# Altium PCB 0.PCB1.PcbDoc (part 10 of 12)
Units mm, origin at the board's own origin, x right, y up, seen from the top; angles counter-clockwise.
Board outline 77 x 72 mm, 6 copper layers (Top Layer, Layer 1, Layer 3, Layer 4, Layer 2, Bottom Layer), stack 1.538 mm thick; 570 components, 490 nets, 3331 pads, 1909 vias.
Unrouted connection lines stored in the file: 2.
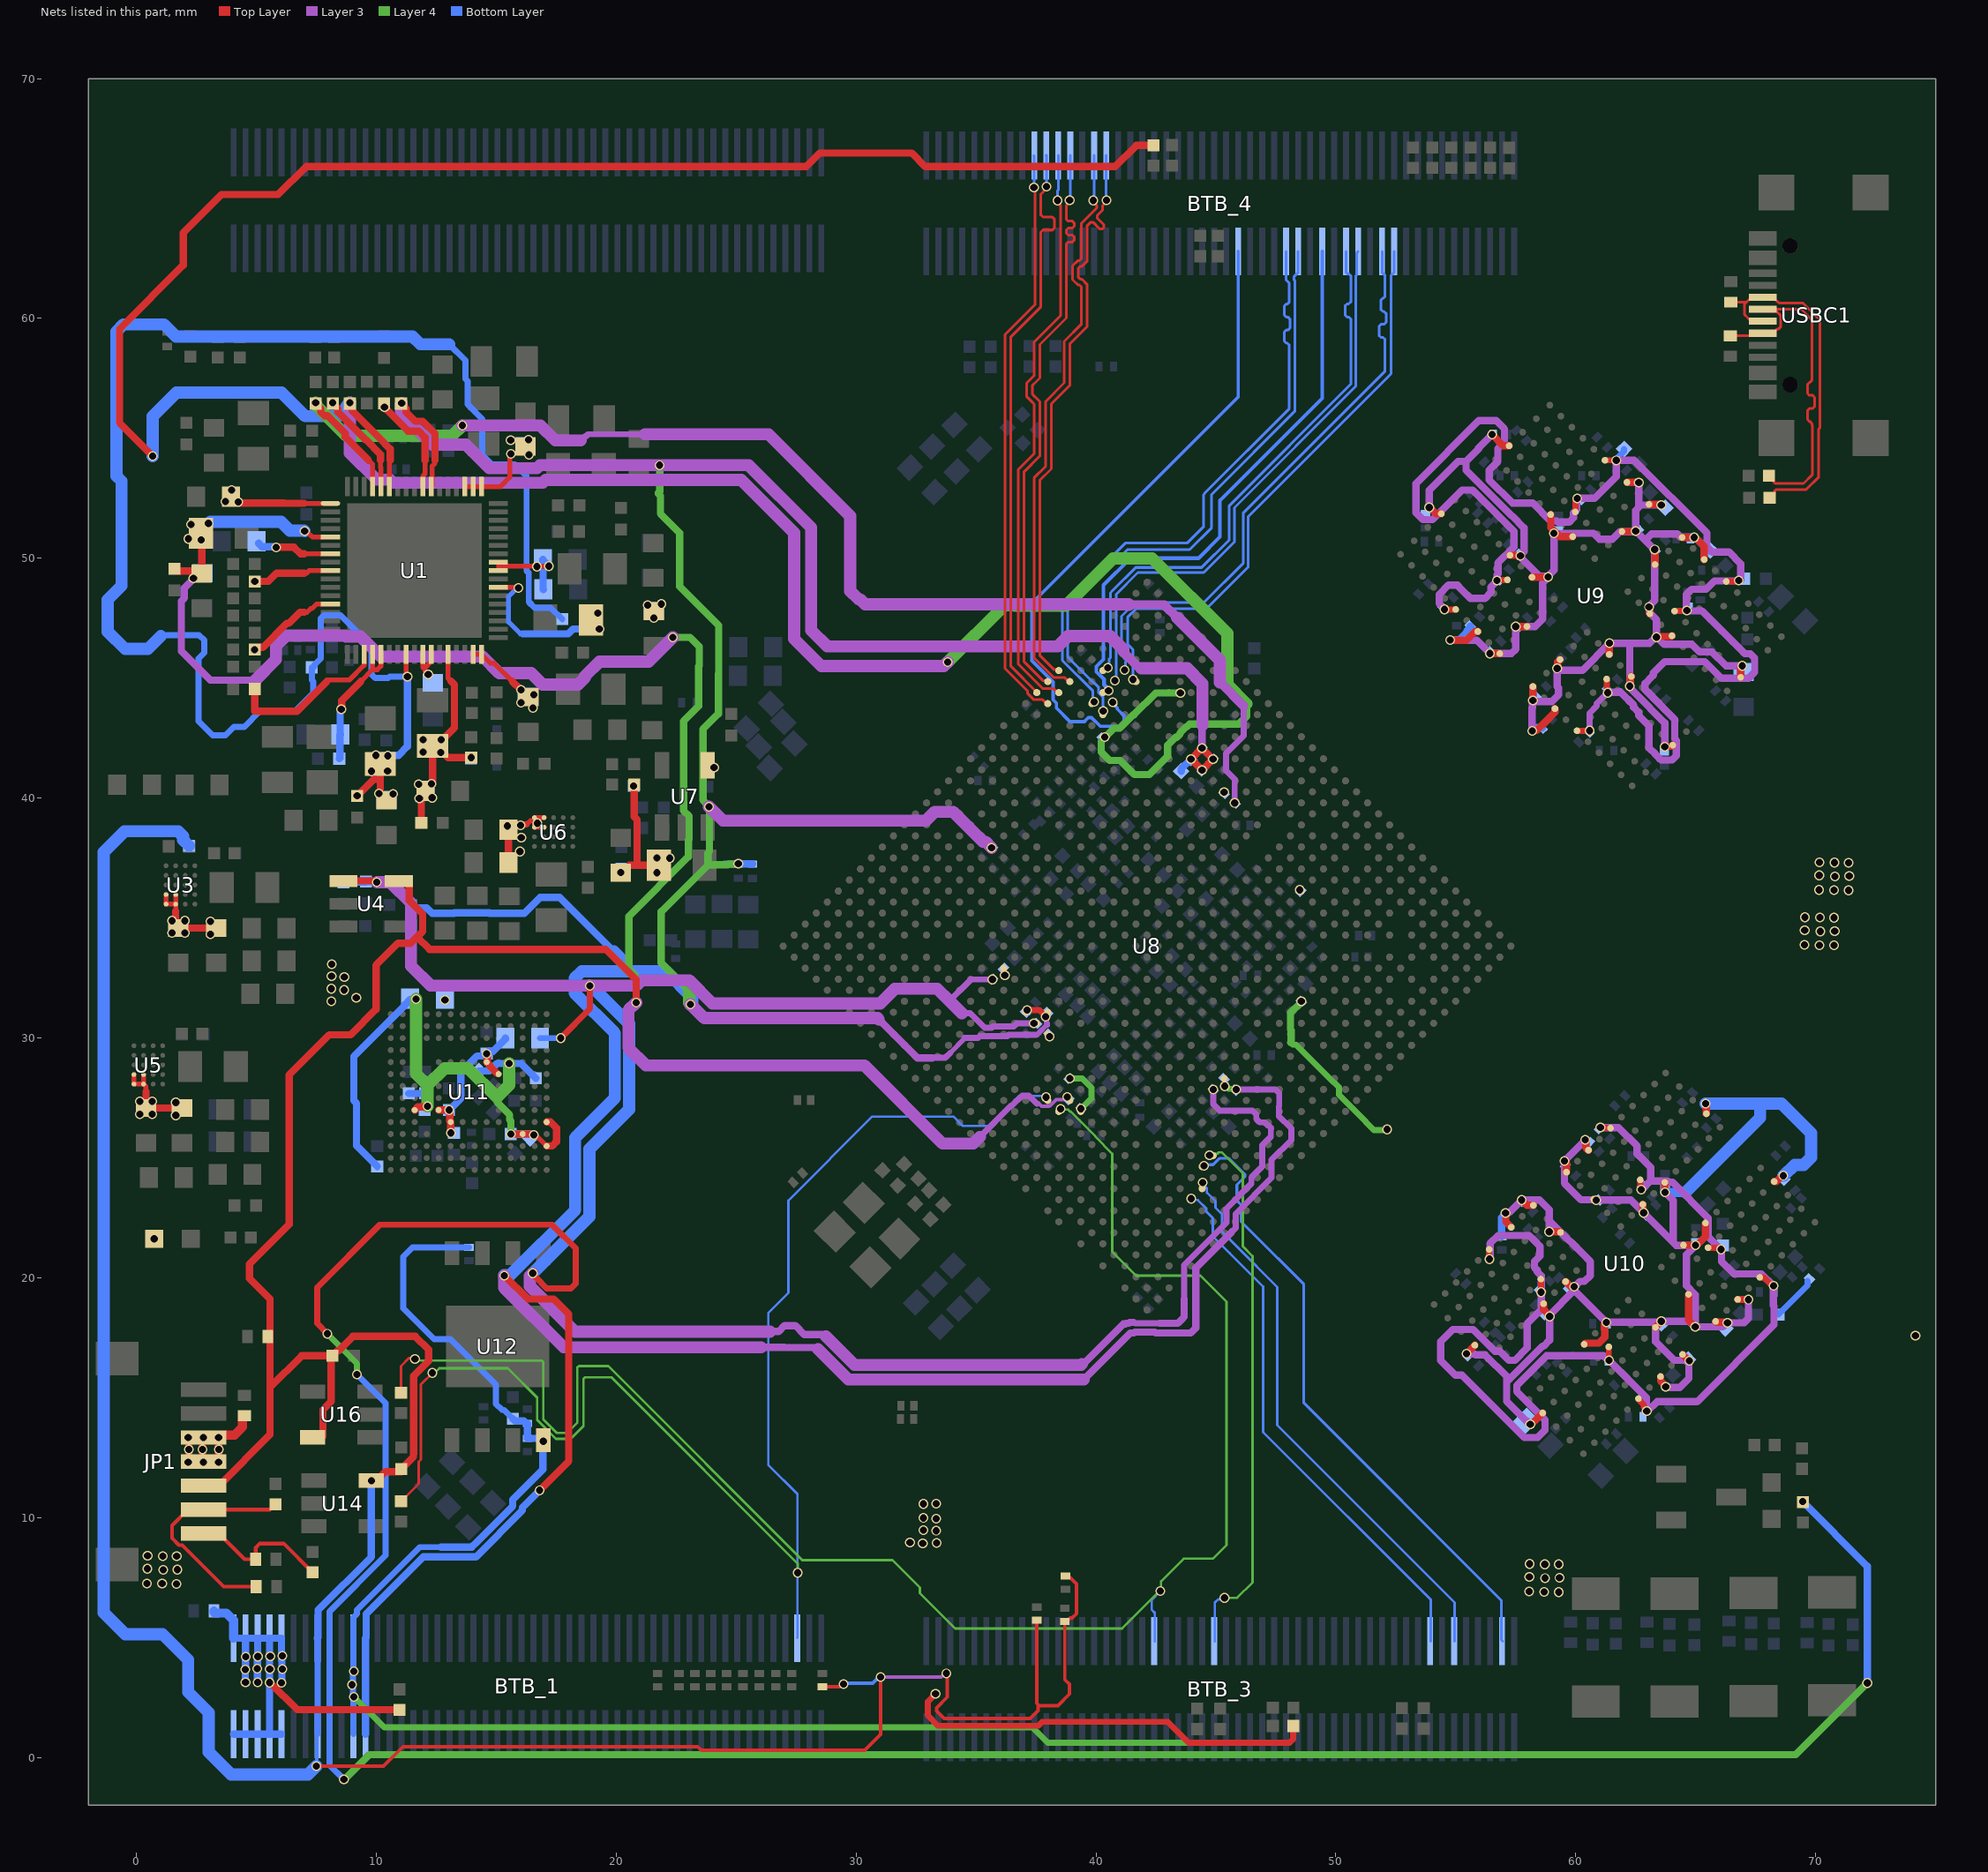
[diagram p14: the nets of this part, all layers, seen from the top]

## Via types
v1: diameter 0.41, hole 0.3, Top Layer to Bottom Layer, tented both sides, 1901 vias
v2: diameter 0.41, hole 0.3, Top Layer to Bottom Layer, 8 vias

## Nets (pads, with @x,y where several pads share a name; then routed paths per layer and width w, separated by ;. In a path a pad name is that pad's centre, name@x,y a point inside that pad or via, vN(x,y) a via of type N, cw(c..) or ccw(c..) an arc to the next point about the centre after c; other vN are vias at no path point) (continued)
TYPEC1_SSRX2N: BTB_4.13 U8.AP10 | length 24.5
  Top Layer w0.112: U8.AP10@37.994,44.856 37.961,44.889 37.801,44.889 37.142,45.548 37.01,45.68 37.01,53.607 37.665,54.262 37.665,55.987 37.665,56.528 37.444,56.75 37.439,56.75 37.357,56.832 37.357,57.212 37.439,57.294 37.444,57.294 37.665,57.516 37.665,58.524 37.665,58.915 38.769,60.019 38.769,62.187 38.769,63.113 38.842,63.186 39.02,63.186 39.093,63.258 39.093,63.403 39.02,63.476 38.842,63.476 38.769,63.548 38.769,63.694 38.842,63.766 39.02,63.766 39.093,63.839 39.093,63.984 39.02,64.056 38.842,64.056 38.769,64.129 38.769,64.706 38.905,64.842 38.905,64.854 v1(38.905,64.92)
  Bottom Layer w0.112: v1(38.905,64.92) 38.931,64.946 BTB_4.13@38.931,66.793
TYPEC1_SSRX2P: BTB_4.12 U8.AN10 | length 24.4
  Top Layer w0.112: v1(38.394,64.916) 38.394,64.838 38.53,64.702 38.53,63.376 38.53,60.118 37.426,59.014 37.426,58.524 37.426,57.615 37.345,57.533 37.34,57.533 37.118,57.312 37.118,56.732 37.34,56.511 37.345,56.511 37.426,56.429 37.426,55.987 37.426,54.361 36.77,53.706 36.77,45.581 37.496,44.855 37.793,44.559 38.241,44.559 38.403,44.397 U8.AN10@38.454,44.397
  Bottom Layer w0.112: v1(38.394,64.916) 38.394,65.312 38.431,65.349 BTB_4.12@38.431,66.793
TYPEC1_SSTX1N: BTB_4.15 U8.AN9 | length 24.3
  Top Layer w0.112: U8.AN9@38.913,44.856 38.862,44.856 38.7,45.018 38.253,45.018 37.421,45.85 37.421,53.345 37.903,53.827 37.903,56.534 38.678,57.31 38.678,59.044 39.398,59.763 39.398,61.184 39.398,61.31 39.316,61.392 39.25,61.392 39.029,61.613 39.029,62.193 39.25,62.414 39.316,62.414 39.398,62.496 39.398,63.62 39.398,63.969 40.038,64.609 40.038,64.702 39.895,64.844 v1(39.895,64.916)
  Bottom Layer w0.112: v1@39.931,64.952 BTB_4.15@39.931,66.793
TYPEC1_SSTX1P: BTB_4.16 U8.AP9 | length 24.3
  Top Layer w0.112: U8.AP9@38.454,45.316 38.421,45.349 38.261,45.349 37.66,45.949 37.66,53.246 38.142,53.728 38.142,56.435 38.917,57.21 38.917,58.945 39.637,59.664 39.637,61.184 39.637,61.409 39.415,61.631 39.349,61.631 39.268,61.713 39.268,62.093 39.349,62.175 39.415,62.175 39.637,62.397 39.637,63.62 39.637,63.87 ; 39.641,63.869 39.785,64.013 39.878,64.013 40.166,63.725 40.259,63.725 40.339,63.804 40.339,63.897 40.048,64.188 40.048,64.281 40.277,64.51 40.277,64.691 40.447,64.861 v1(40.447,64.92)
  Bottom Layer w0.112: v1@40.431,64.936 BTB_4.16@40.431,66.793
TYPEC1_SSTX2N: BTB_4.10 U8.AN11 | length 24.4
  Top Layer w0.112: v1(37.415,65.454) 37.469,65.4 37.469,60.587 36.219,59.336 36.219,50.58 36.219,48.646 36.219,45.39 37.154,44.455 37.154,44.356 37.411,44.099 37.781,44.099 37.943,43.937 U8.AN11@37.994,43.937
  Bottom Layer w0.112: BTB_4.10@37.406,66.79 37.423,66.773 37.423,65.461 v1(37.415,65.454)
TYPEC1_SSTX2P: BTB_4.11 U8.AP11 | length 24.4
  Top Layer w0.112: U8.AP11@37.534,44.397 37.534,44.413 36.458,45.489 36.458,59.237 37.708,60.488 37.708,63.003 37.708,63.603 37.79,63.684 38.183,63.684 38.264,63.766 38.264,64.147 38.183,64.228 37.79,64.228 37.708,64.31 37.708,64.631 37.708,65.186 37.942,65.42 v1(37.942,65.491)
  Bottom Layer w0.112: v1@37.931,65.502 37.936,65.508 37.936,66.788 BTB_4.11@37.931,66.793
TYPEC1_USB20_OTG_DM: BTB_4.70 U8.AL9 | length 25.3
  Bottom Layer w0.112: v1(39.932,44.019) 39.875,44.076 39.875,44.463 38.6,45.738 38.6,46.543 38.594,46.548 38.594,47.996 41.227,50.628 43.796,50.628 44.492,51.325 44.492,52.644 44.522,52.674 44.522,52.7 48.061,56.239 48.061,58.832 48.061,58.888 47.98,58.969 47.938,58.969 47.856,59.051 47.856,59.431 47.938,59.513 48.006,59.513 48.087,59.594 48.087,59.975 48.006,60.056 47.938,60.056 47.856,60.138 47.856,60.518 47.938,60.6 47.98,60.6 48.061,60.681 48.061,61.143 48.061,61.465 47.931,61.596 BTB_4.70@47.931,62.793
TYPEC1_USB20_OTG_DP: BTB_4.69 U8.AK9 | length 25.3
  Bottom Layer w0.112: v1(40.302,43.633) 40.302,44.195 40.17,44.327 40.17,44.336 40.116,44.39 40.116,44.615 39.95,44.781 39.923,44.781 38.823,45.88 38.823,46.777 38.823,47.872 41.311,50.359 43.907,50.359 44.823,51.274 44.823,52.662 48.301,56.14 48.301,58.832 48.301,61.565 48.262,61.603 48.262,61.749 48.431,61.918 BTB_4.69@48.431,62.793
TYPEC1_USB20_OTG_ID: BTB_4.74 U8.AK8 | length 27.4
  Bottom Layer w0.142: v1(40.693,43.997) 40.693,43.951 40.894,43.75 40.894,43.709 41.175,43.427 41.175,43.226 40.942,42.992 40.18,42.992 39.814,43.358 39.69,43.358 39.602,43.27 39.595,43.27 39.519,43.193 38.921,43.193 38.354,43.759 38.354,43.966 38.221,44.099 38.221,44.84 37.554,45.507 37.335,45.726 37.335,48.126 45.931,56.722 BTB_4.74@45.931,62.793
TYPEC1_USB20_VBUSDET: BTB_4.67 U8.AL8 | length 24.1
  Bottom Layer w0.156: v1(40.522,44.473) 40.522,44.541 40.341,44.722 40.341,44.95 40.022,45.269 40.022,45.489 40.312,45.779 40.312,48.265 40.312,48.879 41.43,49.998 44.274,49.998 45.172,50.896 45.172,52.407 49.431,56.666 BTB_4.67@49.431,62.793
typec_dn: R131.1 U13.2 USBC1.A7 USBC1.B7 | length 14.4
  Top Layer w0.112: U13.2@66.441,59.275 67.265,59.275 67.384,59.393 67.783,59.393 USBC1.B7@67.796,59.38 68.221,59.38 68.391,59.551 68.446,59.551 68.551,59.656 68.551,60.112 68.377,60.286 67.89,60.286 USBC1.A7@67.796,60.38 ; R131.1@68.059,53.439 68.254,53.245 68.254,53.182 68.319,53.116 69.5,53.116 69.874,53.491 69.874,55.535 69.844,55.565 69.844,55.621 69.763,55.703 69.747,55.703 69.666,55.784 69.666,56.165 69.747,56.246 69.88,56.246 69.961,56.328 69.961,56.708 69.88,56.79 69.747,56.79 69.666,56.871 69.666,57.252 69.747,57.333 69.763,57.333 69.844,57.415 69.844,58.122 69.844,59.942 69.406,60.38 USBC1.A7@68.347,60.38
typec_dp: R129.1 U15.2 USBC1.A6 USBC1.B6 | length 14.6
  Top Layer w0.112: U15.2@66.466,60.678 67.115,60.678 ; USBC1.A6@67.796,59.88 67.702,59.975 67.223,59.975 67.147,60.051 67.041,60.156 67.041,60.605 67.115,60.678 ; R129.1@68.085,52.525 68.279,52.719 68.279,52.793 68.344,52.858 69.607,52.858 70.132,53.384 70.132,55.386 70.174,55.429 70.174,59.942 69.476,60.64 68.484,60.64 68.436,60.688 68.414,60.688 68.221,60.88 USBC1.B6@67.796,60.88 67.724,60.809 67.245,60.809 67.115,60.678
UART2_RX: JP1.1 R122.1 U19.2 | length 6
  Top Layer w0.156: JP1.1@2.796,9.333 3.446,9.333 4.09,8.689 4.09,8.685 4.512,8.263 U19.2@4.972,8.263 4.972,8.738 5.15,8.917 6.141,8.917 R122.1@7.346,7.711
UART2_RX_M0_DEBUG: BTB_1.48 R123.2 U8.R29 | length 60.8
  Top Layer w0.102: R123.2@11.033,10.676 11.767,11.41 11.767,12.319 11.865,12.417 11.865,15.551 v1(12.342,16.028)
  Layer 4 w0.102: v1(12.342,16.028) 12.425,16.028 12.625,16.228 15.479,16.228 16.707,15 16.707,14.065 17.491,13.282 18.104,13.282 18.638,13.815 18.638,15.788 18.697,15.847 19.802,15.847 27.573,8.076 v1(27.573,7.7)
  Bottom Layer w0.102: BTB_1.48@27.544,4.988 27.56,5.004 v1@27.56,7.7 ; v1(27.573,7.7) 27.56,7.713 27.56,10.974 26.342,12.192 26.342,18.53 27.177,19.366 27.177,23.218 30.677,26.719 32.989,26.719 34.056,26.719 34.443,26.331 35.541,26.331 36.376,27.166 36.39,27.166 36.805,27.581 37.864,27.581 v1(37.921,27.525)
UART2_TX: JP1.2 R126.1 U18.2 | length 9.6
  Top Layer w0.156: U18.2@4.991,7.12 3.639,7.12 1.906,8.853 1.772,8.853 1.483,9.142 1.483,9.669 2.146,10.333 JP1.2@2.796,10.333 5.574,10.333 R126.1@5.797,10.556
UART2_TX_M0_DEBUG: BTB_3.20 R127.2 U8.P29 | length 72.3
  Top Layer w0.102: R127.2@11.033,15.204 11.033,16.319 11.373,16.66 11.377,16.657 11.564,16.657 v1(11.614,16.607)
  Layer 4 w0.102: v1(11.614,16.607) 11.673,16.548 16.902,16.548 16.961,16.489 16.961,14.099 17.532,13.528 17.944,13.528 18.384,13.968 18.384,16.256 18.443,16.316 19.671,16.316 27.759,8.227 31.516,8.227 32.659,7.084 32.659,6.84 34.128,5.37 41.091,5.37 42.653,6.932 v1(42.687,6.932) ; v1(38.53,27.033) 38.556,27.008 38.837,27.008 38.917,26.927 38.952,26.927 39.978,25.901 39.978,25.876 40.685,25.169 40.685,21.08 41.681,20.084 44.36,20.084 44.501,19.943 45.445,19 45.445,8.852 44.876,8.283 43.662,8.283 42.717,7.338 v1@42.717,6.932
  Bottom Layer w0.102: BTB_3.20@42.455,4.843 42.455,6.026 42.329,6.151 42.329,6.575 v1(42.687,6.932)
UART4_RX_M2: BTB_3.45 U8.D26 | length 23.5
  Bottom Layer w0.102: v1(44.446,23.964) 44.446,23.911 44.629,23.728 44.629,23.544 44.984,23.189 44.984,22.923 45.26,22.647 45.26,21.916 45.867,21.309 47.563,19.613 47.563,13.848 54.955,6.457 BTB_3.45@54.955,4.843
UART4_TX_M2: BTB_3.43 U8.D27 | length 22.7
  Bottom Layer w0.102: v1(43.977,23.295) 44.036,23.236 44.252,23.236 44.597,22.891 44.597,22.763 44.874,22.487 44.874,21.727 45.58,21.021 46.969,19.632 46.969,13.561 53.955,6.575 BTB_3.43@53.955,4.843
UART7_RX_M2: BTB_3.25 U8.E24 | length 22.6
  Layer 4 w0.102: v1(44.737,25.112) 44.796,25.171 45.066,25.171 45.124,25.229 45.248,25.229 46.121,24.356 46.121,21.562 46.121,21.308 46.527,20.902 46.527,7.288 45.892,6.653 v1(45.359,6.653)
  Bottom Layer w0.102: BTB_3.25@44.955,4.843 44.955,6.451 45.09,6.586 45.292,6.586 v1(45.359,6.653)
UART7_TX_M2: BTB_3.49 U8.E25 | length 26.3
  Bottom Layer w0.114: v1(44.506,24.667) 44.549,24.71 44.882,24.71 45.146,24.974 45.554,24.974 46.216,24.312 46.216,24.217 45.874,23.876 45.874,23.216 46.044,23.046 46.044,22.35 46.476,21.918 48.669,19.725 48.669,14.78 56.903,6.546 56.903,4.895 BTB_3.49@56.955,4.843
USB20_HOST0_DM: BTB_4.62 U8.AL6 | length 24.4
  Bottom Layer w0.112: v1(41.195,45.344) 41.229,45.378 41.229,45.662 41.246,45.68 41.246,45.772 41.063,45.955 41.063,47.582 41.624,48.142 42.616,48.142 42.623,48.15 44.502,48.15 46.136,49.784 46.136,51.88 52.054,57.798 52.054,59.069 52.054,59.124 51.973,59.206 51.882,59.206 51.8,59.287 51.8,59.668 51.882,59.75 52.012,59.75 52.094,59.831 52.094,60.212 52.012,60.293 51.956,60.293 51.874,60.375 51.874,60.755 51.956,60.837 51.973,60.837 52.054,60.918 52.054,61.471 52.054,61.795 51.931,61.918 BTB_4.62@51.931,62.793
USB20_HOST0_DP: BTB_4.61 U8.AK6 | length 24.3
  Bottom Layer w0.112: v1(41.539,44.944) 41.547,44.953 41.547,46.19 41.317,46.421 41.317,47.533 41.681,47.897 44.607,47.897 46.349,49.64 46.349,51.735 52.307,57.693 52.307,61.795 52.431,61.918 BTB_4.61@52.431,62.793
USB20_HOST1_DM: BTB_4.65 U8.AM7 | length 23.6
  Bottom Layer w0.112: v1(40.49,45.428) 40.547,45.485 40.547,45.789 40.606,45.848 40.606,48.56 40.692,48.646 41.66,49.614 42.605,49.614 44.406,49.614 45.559,50.767 45.559,52.195 50.622,57.258 50.622,59.921 50.622,59.977 50.541,60.059 50.467,60.059 50.386,60.14 50.386,60.521 50.467,60.602 50.541,60.602 50.622,60.684 50.622,61.07 50.622,61.784 50.557,61.849 50.5,61.849 50.431,61.918 BTB_4.65@50.431,62.793
USB20_HOST1_DP: BTB_4.64 U8.AL7 | length 23.7
  Bottom Layer w0.112: v1(40.794,44.895) 40.843,44.943 40.843,48.495 41.749,49.401 42.819,49.401 44.494,49.401 45.773,50.679 45.773,52.106 50.836,57.17 50.836,61.784 50.862,61.809 50.862,62.724 BTB_4.64@50.931,62.793
VCC1V8_PMU_DDR_S3: BTB_1.11 BTB_1.90 C65.2 C66.2 C67.2 C179.2 C183.2 C215.2 C297.2 C298.2 C299.2 C300.2 C301.2 C302.2 C303.2 C304.2 C305.2 C341.2 C342.2 C343.2 C344.2 C345.2 C346.2 C347.2 C348.2 C349.2 C396.2 C397.2 L9.2 R14.1 R16.1 R103.1 R109.1 R110.1 R147.2 U1.25 U8.N28 U8.R27 U8.V26 U9.F1 U9.F12 U9.G4 U9.G9 U9.T4 U9.T9 U9.U1 U9.U12 U10.F1 U10.F12 U10.G4 U10.G9 U10.T4 U10.T9 U10.U1 U10.U12 U12.8 | length 279.7
  Top Layer w0.203: U1.25@11.24,45.988 11.24,45.189 11.297,45.132 v1(11.297,45.066)
  Top Layer w0.254: v1(33.314,2.644) 32.986,2.317 32.986,1.743 33.413,1.316 37.589,1.316 37.754,1.481 42.994,1.481 43.868,0.607 48.069,0.607 48.224,0.762 R147.2@48.224,1.308 ; v1(54.527,47.866) 54.529,47.864 54.997,47.864 U9.F1@54.999,47.862 ; U10.U1@56.397,21.181 56.397,20.785 56.404,20.778 v1@56.411,20.778 ; v1(56.712,49.071) 56.736,49.095 57.151,49.095 U9.G4@57.156,49.1 ; U10.T4@58.549,19.949 U10.T4@58.553,19.944 58.558,19.94 58.558,19.489 58.617,19.429 v1@58.643,19.429 ; U9.G9@59.984,51.928 59.989,51.933 59.989,52.372 60.062,52.445 v1(60.062,52.498) ; U9.U1@60.055,42.806 v1@60.576,42.807 ; v1(61.03,26.261) 61.05,26.242 61.448,26.242 U10.F1@61.453,26.237 ; U9.F12@61.222,54.085 61.223,54.083 61.689,54.083 v1(61.691,54.081) ; U9.T4@61.292,44.963 61.297,44.958 61.297,44.466 61.33,44.433 v1(61.33,44.391) ; U10.T9@61.382,17.115 61.382,16.563 v1(61.386,16.559) ; U10.U12@62.619,14.959 62.624,14.954 62.624,14.926 62.847,14.703 62.847,14.604 ; U10.G4@62.69,24.08 62.695,24.075 62.695,23.708 v1(62.732,23.671) ; U9.T9@64.121,47.791 64.126,47.796 64.608,47.796 v1(64.637,47.826) ; U10.G9@65.518,21.252 65.523,21.248 65.94,21.248 66.007,21.181 v1(66.06,21.181) ; U9.U12@66.277,49.029 66.282,49.034 66.759,49.034 v1(66.796,49.071) ; U10.F12@67.675,20.015 67.68,20.01 67.839,20.01 68.191,19.657 v1(68.244,19.657)
  Top Layer w0.305: v1(9.203,40.091) 9.887,40.775 10.168,40.775 ; L9.2@10.168,41.427 10.168,40.775 ; C65.2@10.422,39.901 10.391,39.901 10.168,40.124 10.168,40.775 ; v1(16.961,13.18) U12.8@16.961,13.229
  Layer 3 w0.254: v1(60.577,42.808) 60.577,43.542 60.874,43.839 60.874,43.934 v1(61.33,44.391)
  Layer 3 w0.305: v1(54.527,47.866) 54.527,47.894 54.308,48.113 54.308,48.491 54.7,48.883 55.049,48.883 55.608,48.324 56.217,48.324 56.465,48.572 56.465,48.795 56.707,49.037 v1@56.707,49.071 ; v1(56.411,20.778) 56.432,20.798 56.432,21.424 56.768,21.761 58.059,21.761 58.508,21.311 58.508,20.902 58.285,20.679 58.285,20.426 58.397,20.315 58.397,20.25 58.562,20.085 v1(58.562,19.398) 58.562,18.662 57.977,18.078 57.977,17.069 57.465,16.557 57.212,16.557 56.834,16.935 56.634,16.935 55.724,17.844 54.881,17.844 54.373,17.336 54.373,16.551 54.988,15.936 55.26,15.936 57.858,13.338 58.419,13.338 58.724,13.643 58.724,14.074 57.544,15.255 57.544,15.508 58.78,16.744 61.172,16.744 61.358,16.559 v1(61.386,16.559) 62.944,15 62.944,14.454 v1(62.964,14.434) 62.993,14.434 63.393,14.834 65.064,14.834 68.269,18.039 68.269,18.821 68.244,18.847 v1(68.244,19.657) 67.741,20.16 66.597,20.16 66.08,20.678 66.08,21.161 65.531,21.71 65.531,22.484 64.038,23.978 63.883,23.978 63.827,24.034 63.124,24.034 ; v1(56.712,49.071) 56.733,49.091 56.733,49.315 56.763,49.346 56.763,49.8 57.431,50.468 57.431,51.11 55.7,52.842 55.264,52.842 54.033,51.611 53.626,51.611 53.344,51.893 53.344,53.122 55.963,55.741 56.679,55.741 57.028,55.392 57.028,54.85 56.753,54.575 56.753,54.029 56.396,53.671 56.396,53.267 57.361,52.301 58.209,52.301 58.953,51.557 59.204,51.557 59.257,51.504 59.727,51.504 59.905,51.682 59.905,51.882 60.042,52.019 60.042,52.461 v1@60.079,52.498 ; v1(60.062,52.498) v1@60.079,52.498 ; v1(61.03,26.261) 61.785,26.261 62.559,25.487 62.559,25.167 63.124,24.602 63.124,24.034 ; v1(61.33,44.391) 61.35,44.411 61.856,44.411 61.868,44.423 62.415,43.876 62.415,43.787 62.62,43.582 62.62,43.447 63.05,43.018 63.05,42.108 63.334,41.824 63.334,41.809 63.558,41.585 64.017,41.585 64.195,41.764 64.195,42.395 64.127,42.464 64.127,43.285 62.892,44.52 62.892,44.772 63.179,45.06 63.243,45.123 63.243,45.22 63.708,45.685 65.381,45.685 66.067,44.999 67.215,44.999 67.459,45.243 67.459,45.844 67.281,46.023 67.048,46.023 65.264,47.806 64.657,47.806 v1(64.637,47.826) ; v1@61.686,54.052 61.691,54.046 61.691,53.403 60.786,52.498 v1@60.079,52.498 ; v1(61.691,54.081) 61.693,54.083 62.442,54.083 65.473,51.052 65.473,50.47 65.681,50.262 66.387,50.262 66.875,49.774 v1@66.875,49.088 ; v1(62.732,23.671) 62.761,23.671 63.124,24.034 ; v1@64.614,47.907 64.614,48.481 64.835,48.702 65.435,48.702 65.786,49.054 66.779,49.054 v1(66.796,49.071)
  Layer 4 w0.254: v1(9.058,2.521) 10.33,1.25 37.355,1.25 37.995,0.61 45.745,0.61 ; v1(38.913,28.31) 39.429,28.31 39.811,27.928 39.811,27.484 v1(39.374,27.046)
  Bottom Layer w0.254: 1.017,46.749 1.066,46.798 2.615,46.798 2.829,46.584 2.829,46.061 2.593,45.824 2.593,43.198 3.172,42.619 3.713,42.619 4.063,42.97 4.498,42.97 5.156,43.627 6.614,43.627 7.374,44.387 7.374,44.859 7.311,44.921 R14.1@7.311,45.45 ; R14.1@7.406,45.466 7.406,45.545 7.682,45.821 7.682,46.264 7.682,47.489 7.817,47.624 8.506,47.624 9.806,46.323 9.806,45.15 9.955,45.001 10.498,45.001 10.563,45.066 v1(11.297,45.066) ; BTB_1.90@9.051,0.97 9.051,2.521 9.029,2.544 9.029,2.951 8.993,2.986 v1(8.993,3.028) 9.023,3.058 9.023,3.508 9.051,3.536 BTB_1.11@9.051,4.97 9.051,5.841 9.197,5.987 9.197,6.139 11.826,8.767 12.693,8.767 ; v1(12.863,31.581) R103.1@12.863,31.641 ; 13.042,58.921 13.711,58.252 13.711,57.471 13.802,57.38 13.802,56.419 14.414,55.808 14.414,54.316 14.814,53.915 15.782,53.915 16.264,53.433 16.264,49.472 16.357,49.38 16.357,48.18 16.598,47.939 17.274,47.939 R16.1@17.756,47.457 ; R110.1@13.868,21.258 11.514,21.258 11.127,20.872 11.127,18.718 12.405,17.44 13.09,17.44 14.989,15.542 14.989,14.741 15.243,14.487 15.325,14.487 C397.2@15.691,14.12 ; C305.2@61.767,54.201 62.021,54.455 C297.2@62.021,54.557 ; C344.2@68.265,19.403 68.265,18.657 68.407,18.514 C341.2@68.422,18.514 ; C341.2@68.458,18.464 69.671,19.677 C343.2@69.671,19.871
  Bottom Layer w0.305: v1(9.982,41.78) 9.991,41.771 10.473,41.771 v1(10.482,41.763) 10.502,41.783 10.932,41.783 11.297,42.148 v1(11.297,45.066) ; 12.693,8.767 13.98,8.767 14.17,8.957 15.685,10.472 15.685,10.744 16.941,12.001 16.941,13.16 v1(16.961,13.18) 16.922,13.18 16.806,13.296 16.303,13.296 R109.1@16.301,13.299 C396.2@16.301,13.922 16.256,13.922 16.155,14.023 15.789,14.023 C397.2@15.691,14.12
  Bottom Layer w0.508: 1.017,46.749 0.486,46.218 -0.471,46.218 -1.195,46.942 -1.195,48.273 -0.618,48.85 -0.618,53.221 -0.829,53.432 -0.829,59.454 -0.531,59.751 1.147,59.751 1.655,59.243 11.513,59.243 11.836,58.921 13.042,58.921
  other v1: 9.067,3.594 1.074,7.244 1.676,7.234 0.444,7.255 1.114,7.818 1.709,7.829 0.456,7.864 1.678,8.39 0.467,8.408 1.097,8.393 74.165,17.587 38.063,30.055 8.132,31.529 9.166,31.674 8.656,31.994 8.13,32.053 8.668,32.543 8.135,32.568 8.143,33.074 71.373,36.15 70.141,36.17 70.771,36.16 70.812,36.734 71.406,36.744 70.154,36.78 70.164,37.323 70.794,37.308 71.376,37.305 10.701,40.167 10.117,40.192 9.799,41.12 10.473,41.132
VCC3V3_FLASH: C385.1 C386.1 C387.1 R104.2 U11.E6 U11.F5 U11.J10 U11.K9 | length 6.7
  Top Layer w0.305: U11.E6@12.602,26.991 v1(13.035,26.991) 13.063,26.963 13.063,26.53 U11.F5@13.102,26.491 13.102,26.051 v1(13.116,26.037) ; U11.J10@14.602,28.991 14.733,28.86 14.733,28.82 U11.K9@15.045,28.508 ; v1(14.602,29.343) 14.63,29.316 U11.J10@14.63,28.991
  Bottom Layer w0.305: v1(13.035,26.991) 13.529,27.485 13.529,28.571 14.204,29.246 14.504,29.246 v1(14.602,29.343) 14.7,29.441 14.877,29.441 15.377,29.941 R104.2@15.377,29.991
VCC4V0_SYS: BTB_1.1 BTB_1.2 BTB_1.3 BTB_1.4 BTB_1.5 BTB_1.96 BTB_1.97 BTB_1.98 BTB_1.99 BTB_1.100 C1.1 C3.1 C17.2 C19.1 C20.1 C37.1 C38.1 C49.1 C50.1 C60.2 C61.1 C62.1 C79.2 C81.2 C89.2 C90.2 C91.1 C101.2 C103.2 JP1.4 JP1.5 LED1.1 R128.2 U1.1 U1.7 U1.21 U1.22 U1.27 U1.28 U1.33 U1.34 U1.43 U1.44 U1.52 U1.53 U1.54 U1.64 U3.D1 U3.D2 U3.E1 U3.E2 U5.D1 U5.D2 U5.E1 U5.E2 U6.D1 U6.D2 U6.E1 U6.E2 U7.4 U23.2 U24.2 | length 67.7
  Top Layer w0.203: U5.D1@-0.101,28.471 U5.E1@-0.101,28.071 U5.E2@0.299,28.071 ; U5.D2@0.299,28.471 U5.E2@0.299,28.071 ; 0.401,27.76 0.401,27.97 U5.E2@0.299,28.071 ; U3.D1@1.237,35.976 U3.E1@1.237,35.576 U3.E2@1.637,35.576 ; 1.637,35.29 U3.E2@1.637,35.576 ; U3.D2@1.637,35.976 U3.E2@1.637,35.576 ; 6.993,50.189 U1.7@8.09,50.189 ; 6.993,52.289 U1.1@8.09,52.289 ; 9.355,44.866 9.84,45.351 ; U1.21@9.84,45.988 9.84,45.351 ; 10.175,54.086 10.175,53.787 10.19,53.771 U1.64@10.19,52.989 ; U1.22@10.19,45.988 10.189,45.987 10.189,45.496 10.044,45.351 9.84,45.351 ; U1.27@11.94,45.988 11.942,45.987 11.942,45.457 12.038,45.361 12.038,45.284 12.161,45.16 v1(12.161,45.151) ; 11.999,45.4 12.29,45.692 U1.28@12.29,45.988 ; U1.54@13.69,52.989 U1.53@14.04,52.989 U1.52@14.39,52.989 15.18,52.989 15.56,53.369 15.56,54.293 15.649,54.383 15.94,54.383 C3.1@16.213,54.656 ; U1.33@14.04,45.988 U1.34@14.39,45.988 14.759,45.62 14.921,45.62 15.675,44.866 ; U1.44@15.091,49.839 15.108,49.839 15.11,49.837 15.11,49.675 ; U1.43@15.11,49.546 15.11,49.675 ; 16.284,38.915 16.432,39.063 16.593,39.063 U6.E1@16.593,39.184 U6.D1@16.993,39.184 ; v1@16.593,38.946 U6.E2@16.593,38.784 U6.D2@16.993,38.784 ; v1@16.655,39.008 v1(16.718,38.946) ; v1(17.198,49.67) 17.189,49.661 16.707,49.661 v1(16.698,49.652) 16.675,49.675 15.11,49.675
  Top Layer w0.254: C103.2@15.514,38.732 15.652,38.87 v1(16.019,38.87) 16.049,38.9 16.269,38.9 16.284,38.915
  Top Layer w0.305: 0.401,27.76 C90.2@0.401,27.074 C89.2@1.899,27.074 ; 1.637,35.29 1.637,34.687 C79.2@1.745,34.579 C81.2@3.32,34.579 ; JP1.4@2.133,12.302 2.185,12.353 v1(2.185,12.839) ; v1@2.157,12.879 2.176,12.879 2.185,12.888 2.185,13.311 v1(2.157,13.338) ; v1(2.755,12.84) 2.755,13.301 v1(2.792,13.338) ; JP1.4@2.77,12.375 2.755,12.391 2.755,12.807 v1@2.792,12.844 ; JP1.4@3.423,12.296 3.427,12.3 v1(3.427,12.302) 3.431,12.306 v1(3.431,12.838) ; v1(3.427,13.338) 3.431,13.334 v1@3.431,12.863 ; C37.1@3.945,52.562 4.146,52.361 4.222,52.361 v1(4.241,52.342) ; C37.1@4.098,52.409 4.199,52.409 4.313,52.296 6.151,52.296 6.158,52.289 6.993,52.289 ; v1(5.55,3.119) 5.57,3.119 6.703,1.986 R128.2@10.967,1.986 ; v1(5.823,50.456) 6.571,50.456 6.838,50.189 6.993,50.189 ; C17.2@8.187,56.448 8.394,56.241 8.394,56.093 9.537,54.95 9.558,54.95 10.175,54.333 10.175,54.086 ; v1(8.543,43.706) 8.563,43.726 8.563,44.073 9.355,44.866 ; v1(15.464,38.839) 15.464,38.731 C103.2@15.514,38.682 C101.2@15.514,37.31 ; 15.675,44.866 16.001,44.54 C20.1@16.001,44.476 ; C20.1@15.997,44.472 C20.1@16.391,44.078
  Top Layer w0.381: v1(3.427,13.338) 3.531,13.442 4.087,13.442 4.421,13.777 4.421,14.212 4.455,14.246 U24.2@4.498,14.246
  Bottom Layer w0.305: BTB_1.100@4.051,0.97 BTB_1.99@4.551,0.97 BTB_1.98@5.051,0.97 BTB_1.97@5.551,0.97 ; BTB_1.1@4.051,4.97 BTB_1.2@4.551,4.97 ; v1(4.539,3.668) 4.543,3.664 4.543,3.136 v1@4.551,3.128 ; v1@4.546,3.668 4.548,3.671 4.548,4.199 4.551,4.202 BTB_1.2@4.551,4.97 ; v1(5.05,3.131) 5.044,3.137 5.044,3.688 v1(5.039,3.694) 5.045,3.7 5.045,4.198 5.051,4.204 BTB_1.3@5.051,4.97 ; C49.1@5.105,50.633 5.105,50.606 5.234,50.476 5.803,50.476 v1(5.823,50.456) ; BTB_1.97@5.551,1.817 BTB_1.97@5.551,0.97 ; BTB_1.97@5.551,1.817 5.551,3.118 5.554,3.122 5.554,3.677 v1(5.559,3.681) ; BTB_1.4@5.555,4.122 5.555,3.699 v1@5.558,3.696 ; BTB_1.4@5.61,4.179 5.551,4.238 BTB_1.4@5.551,4.97 ; v1(6.05,3.107) 6.066,3.123 6.066,3.67 v1(6.083,3.686) 6.067,3.702 BTB_1.5@6.067,4.122 ; BTB_1.96@6.051,0.97 BTB_1.97@5.551,0.97 ; v1(6.08,4.235) 6.051,4.264 BTB_1.5@6.051,4.97 BTB_1.4@5.551,4.97 ; C60.2@8.459,41.64 8.482,41.663 8.482,42.633 C50.1@8.505,42.656 8.491,42.67 8.491,43.626 8.543,43.677 v1(8.543,43.706) ; C62.1@16.96,48.7 16.955,48.705 16.955,49.941 C1.1@16.95,49.946 16.95,49.918 v1(17.198,49.67) ; BTB_1.2@4.551,4.97 BTB_1.3@5.051,4.97 ; BTB_1.3@5.051,4.97 BTB_1.4@5.551,4.97
  Bottom Layer w0.381: U23.2@3.234,6.101 3.234,6.051 3.268,6.017 3.748,6.017 4.051,5.714 BTB_1.1@4.051,4.97
  other v1: 4.547,3.128 4.556,4.202 5.067,4.204 5.581,4.208 2.157,12.302 2.792,12.302 0.744,21.622 1.645,26.769 0.147,26.82 0.655,26.82 1.645,27.303 0.147,27.354 0.655,27.354 3.092,34.325 1.491,34.376 2.025,34.376 3.092,34.858 1.491,34.884 2.025,34.884 15.991,37.77 16.044,38.354 24.08,41.274 16.535,43.762 16.035,43.977 16.573,44.303 16.035,44.51 3.716,52.359 3.972,52.837 16.367,54.316 15.615,54.349 15.605,54.918 16.342,54.943 8.187,56.481
VCC_1V1_NLDO_S3: C31.2 C35.2 C92.2 C93.2 C94.2 L14.2 R25.2 U1.9 U1.13 | length 12.6
  Top Layer w0.203: 6.993,47.747 7.111,47.747 7.263,47.9 7.316,47.9 7.503,48.087 U1.13@8.09,48.089 U1.13@8.09,48.089 ; 6.993,49.376 7.093,49.376 7.205,49.489 U1.9@8.09,49.489
  Top Layer w0.305: v1(4.928,46.187) 5.026,46.284 5.27,46.284 6.272,47.286 6.355,47.286 6.817,47.747 6.993,47.747 ; v1(4.936,49.031) 5.505,49.031 5.849,49.376 6.993,49.376 ; v1(20.196,36.89) 20.246,36.89 20.553,37.197 20.831,37.197 ; R25.2@20.754,40.557 20.754,39.22 20.875,39.1 20.875,37.241 20.831,37.197 ; L14.2@21.692,37.104 L14.2@21.786,37.197 20.831,37.197
  other v1: 21.699,36.885 22.234,37.493 21.699,37.502 20.729,40.507
VCC_1V8_S0: BTB_1.12 BTB_1.89 C5.2 C216.2 C240.2 C241.2 C252.2 C253.2 C262.2 C263.2 C264.2 C272.2 C273.2 C274.2 C291.2 C293.2 C295.2 R21.1 U1.58 U8.AA7 U8.AC6 U8.AC7 U8.AC25 U8.AD6 U8.AD7 U8.AJ20 U8.G20 U8.H20 U8.W25 U8.Y26 | length 213.7
  Top Layer w0.203: U1.58@12.29,52.989 12.336,53.034 12.336,53.846 12.445,53.956 12.445,54.086
  Top Layer w0.254: U8.AC25@36.155,32.906 36.164,32.897 36.164,32.694 36.2,32.659 v1(36.2,32.617) ; v1(37.126,31.158) 37.646,31.158 37.904,30.901 v1(37.904,30.88)
  Top Layer w0.305: C5.2@11.032,56.448 11.239,56.241 11.239,56.093 11.624,55.708 11.934,55.708 12.445,55.196 12.445,54.086 ; C5.2@11.032,56.479 11.049,56.479 v1(11.06,56.469) ; v1(15.331,20.09) 15.34,20.09 16.321,19.109 17.398,19.109 18.021,18.486 18.021,12.347 v1(16.809,11.136) ; v1(43.965,41.624) v1(44.424,41.164) 44.879,41.619 v1(44.882,41.619) v1(44.422,42.079) 44.42,42.079 v1(43.965,41.624)
  Layer 3 w0.203: 33.934,29.38 34.509,29.955 34.509,29.997 ; 37.508,30.128 37.548,30.128 ; 37.969,30.608 37.976,30.601 37.976,30.532
  Layer 3 w0.219: 37.548,30.128 37.637,30.217 37.637,30.231 37.938,30.532 37.976,30.532
  Layer 3 w0.233: v1(37.904,30.88) 37.938,30.846 37.938,30.639 37.969,30.608
  Layer 3 w0.254: 33.179,29.165 33.719,29.165 33.934,29.38 ; 34.509,29.997 35.085,29.997 35.167,30.079 36.312,30.079 36.361,30.128 37.508,30.128 ; v1(37.126,31.158) v1@37.126,31.193 ; 45.668,21.915 45.825,22.072 45.825,22.667 47.327,24.169 47.327,24.915 48.146,25.734 48.146,26.222 47.622,26.746 47.622,27.139 47.641,27.158 47.641,27.696 47.492,27.845 v1(45.853,27.845)
  Layer 3 w0.305: 26.042,17.097 27.008,17.097 27.019,17.086 28.354,17.086 28.416,17.024 ; 30.943,30.778 32.561,29.16 33.174,29.16 33.179,29.165 ; 39.491,15.753 41.432,17.694 41.578,17.694 41.616,17.732 42.457,17.732 42.493,17.697 43.953,17.697 44.167,17.911 44.167,20.414 45.668,21.915 ; v1(44.422,42.079) 44.422,43.026 44.439,43.043
  Layer 3 w0.381: 41.152,46.124 41.152,46.081 41.823,45.41 41.894,45.41
  Layer 3 w0.508: v1(11.06,56.469) 11.032,56.441 11.032,56.046 12.344,54.735 13.733,54.735 14.714,53.754 16.692,53.754 16.817,53.879 v1(21.816,53.879) 25.524,53.879 28.127,51.275 28.127,46.995 28.798,46.325 38.412,46.325 38.838,46.752 40.586,46.752 41.152,46.185 41.152,46.124 ; v1(15.331,20.09) 15.331,19.579 17.812,17.097 26.042,17.097 ; v1(23.102,31.398) 23.674,30.827 30.894,30.827 30.943,30.778 ; v1(23.873,39.637) 24.449,39.06 32.922,39.06 33.29,39.429 34.035,39.429 35.288,38.177 35.403,38.177 v1(35.651,37.929) ; 28.416,17.024 29.687,15.753 39.491,15.753 ; 41.894,45.41 43.802,45.41 44.439,44.773 44.439,43.043
  Layer 4 w0.254: v1(45.373,27.987) v1@45.402,27.987 ; v1@45.402,27.956 45.403,27.957 45.445,27.957 45.528,27.875 45.823,27.875 v1(45.853,27.845)
  Layer 4 w0.305: v1(21.816,53.879) 21.817,53.877 21.817,52.786 21.762,52.73 21.762,52.69 21.846,52.606 21.846,51.855 22.646,51.055 22.646,48.825 24.276,47.195 24.276,45.183 24.264,45.171 24.264,43.509 23.621,42.866 23.621,39.917 v1@23.873,39.665 ; 23.041,31.965 21.876,33.13 21.876,35.265 23.827,37.215 ; v1(23.873,39.637) v1@23.873,39.665 ; v1(25.094,37.27) 25.074,37.25 24.683,37.25 24.648,37.215 23.827,37.215 ; 23.827,37.215 23.827,37.708 23.887,37.769 23.887,39.651 v1@23.873,39.665
  Layer 4 w0.508: 23.041,31.965 23.042,31.964 23.042,31.458 v1(23.102,31.398)
  Bottom Layer w0.305: BTB_1.89@9.551,0.97 BTB_1.12@9.551,4.97 9.579,4.997 9.579,5.981 11.958,8.361 14.152,8.361 16.091,10.3 16.091,10.418 v1(16.809,11.136) ; R21.1@11.453,35.526 11.55,35.428 12.098,35.428 12.326,35.2 13.24,35.2 13.251,35.211 14.707,35.211 14.718,35.2 16.175,35.2 16.829,35.855 17.645,35.855 19.898,33.603 ; 20.419,32.775 20.419,33.082 ; 24.508,37.247 24.51,37.249 25.074,37.249 v1(25.094,37.27) 25.114,37.251 C264.2@25.684,37.251 ; C274.2@43.555,41.12 43.555,41.214 v1(43.965,41.624)
  Bottom Layer w0.508: v1(15.331,20.09) 15.34,20.099 15.572,20.099 18.291,22.819 18.291,25.836 19.947,27.492 19.947,30.196 18.268,31.875 18.268,32.477 18.566,32.775 20.419,32.775 22.081,32.775 23.177,31.68 23.177,31.473 v1(23.102,31.398) ; 19.898,33.603 20.419,33.082
  other v1: 45.344,40.245
VCC_1V8_S3_PLDO6: C51.2 U1.20 | length 6.7
  Top Layer w0.203: 7.943,44.866 7.995,44.918 8.872,44.918 9.49,45.536 U1.20@9.49,45.988
  Top Layer w0.305: C51.2@4.94,44.546 4.931,44.537 4.931,43.615 6.693,43.615 7.943,44.866
VCC_2V0_PLDO_S3: C4.2 C68.2 C69.2 L10.2 U1.41 U1.59 | length 12.2
  Top Layer w0.203: U1.59@11.94,52.989 11.942,52.99 11.942,53.397 11.987,53.442 11.987,53.473 12.031,53.516 12.031,54.086 ; U1.41@15.091,48.789 15.092,48.787 15.894,48.787 v1(15.923,48.758)
  Top Layer w0.305: C4.2@10.32,56.455 10.331,56.445 10.331,56.307 v1(10.341,56.296) ; v1@10.418,56.203 11.319,55.301 11.766,55.301 12.031,55.036 12.031,54.086
  Bottom Layer w0.203: v1(15.923,48.758) 15.867,48.758 15.764,48.655 15.754,48.655 15.515,48.415 15.515,47.342 16.01,46.847 16.112,46.847
  Bottom Layer w0.305: 16.112,46.847 18.005,46.847 18.206,47.048 18.649,47.048 18.677,47.076 18.664,47.088 18.664,47.723 18.667,47.721 19.224,47.721 v1(19.239,47.706) 19.239,47.677 19.279,47.637 19.279,47.066 v1(19.299,47.045)
  other v1: 21.569,47.51 21.319,48.043 21.881,48.089
VCC_3V3_S0: BTB_1.9 BTB_1.92 C77.2 C78.2 C292.2 C294.2 C296.2 R18.1 R104.1 U4.1 U8.AC26 U8.H21 U8.W26 | length 211
  Top Layer w0.254: v1(7.962,17.665) 7.533,18.094 7.533,19.591 10.152,22.21 17.33,22.21 18.318,21.222 18.318,19.751 18.115,19.548 17.101,19.548 16.88,19.769 16.88,19.783 16.52,20.143 v1(16.52,20.185) ; v1(17.686,29.991) 18.91,31.214 v1(18.91,32.175)
  Top Layer w0.305: U4.1@8.633,36.543 v1@9.953,36.543 ; v1(69.461,10.671) 69.461,10.651 R18.1@69.473,10.639
  Layer 3 w0.254: 33.896,31.54 34.793,32.437 v1(35.69,32.437) ; 34.404,31.032 34.756,31.032 35.364,30.424 35.666,30.424 35.715,30.473 36.58,30.473 36.717,30.61 v1(37.415,30.61) ; 41.571,18.136 41.607,18.136 41.64,18.103 42.661,18.103 ; 43.599,18.286 43.621,18.309 ; 43.681,19.123 43.681,20.528 45.446,22.292 45.446,22.89 46.483,23.927 46.483,24.18 46.941,24.638 46.941,25.531 47.293,25.883 47.293,26.199 47.308,26.214 47.308,26.254 47.197,26.365 47.146,26.365 47.035,26.476 46.833,26.476 46.684,26.625 46.684,26.814 46.535,26.963 45.172,26.963 44.887,27.248 v1(44.887,27.845)
  Layer 3 w0.303: 41.126,18.05 41.145,18.07 41.233,18.07
  Layer 3 w0.305: 26.415,17.755 26.77,17.755 27.019,18.004 27.468,18.004 27.841,17.63 28.672,17.63 28.744,17.559 ; 39.417,16.397 39.473,16.397 41.126,18.05 ; 41.233,18.07 41.263,18.1 41.369,18.1 41.404,18.136 41.571,18.136 ; 42.661,18.103 43.416,18.103 43.599,18.286 ; 43.621,18.309 43.681,18.369 43.681,19.123
  Layer 3 w0.508: v1(10.027,36.498) 10.578,36.498 11.447,35.629 11.447,33.003 12.267,32.182 20.847,32.182 21.067,32.403 23.043,32.403 24.01,31.436 31.006,31.436 31.617,32.048 33.388,32.048 33.896,31.54 34.404,31.032 ; v1(16.52,20.185) 16.4,20.065 16.4,19.64 18.285,17.755 26.415,17.755 ; v1@18.887,32.198 v1(18.91,32.175) ; 28.744,17.559 29.939,16.363 39.382,16.363 39.417,16.397
  Layer 4 w0.254: v1(7.962,17.665) 9.199,16.427 v1(9.199,15.969)
  Layer 4 w0.305: v1(8.651,-0.919) 8.679,-0.919 9.713,0.115 69.174,0.115 v1(72.158,3.099)
  Bottom Layer w0.254: v1(8.651,-0.919) 8.053,-0.322 8.053,0.968 BTB_1.92@8.051,0.97 BTB_1.9@8.051,4.97 8.053,4.972 8.053,6.08 10.393,8.42 10.393,14.775 v1(9.199,15.969) ; R104.1@16.827,29.991 v1(17.686,29.991)
  Bottom Layer w0.305: C78.2@8.633,36.49 8.646,36.503 9.561,36.503 C77.2@9.573,36.516 9.582,36.507 10.018,36.507 v1(10.027,36.498) ; v1(69.461,10.671) 72.158,7.973 v1(72.158,3.099)
  Bottom Layer w0.508: v1(16.52,20.185) 18.891,22.556 18.891,25.366 20.546,27.022 20.546,30.584 18.954,32.175 v1(18.91,32.175)
VCC_3V3_S3: BTB_1.8 BTB_1.93 C52.2 C53.2 C54.2 C184.2 C398.1 C399.1 JP1.3 L7.2 R19.2 R39.1 R41.1 R43.1 R44.1 U1.5 U4.5 U8.P28 U14.5 U16.5 U25.2 | length 248
  Top Layer w0.142: v1(7.497,-0.368) 10.302,-0.368 11.117,0.447 23.403,0.447 23.558,0.292 30.357,0.292 31.02,0.955 v1(31.02,3.346) ; R44.1@28.595,2.949 29.304,2.949 29.411,3.055 v1(29.483,3.055) ; v1(33.767,3.503) 33.807,3.464 33.807,2.511 33.355,2.06 33.355,1.935 33.674,1.616 37.264,1.616 37.595,1.947 37.595,2.201 ; R39.1@37.535,5.717 37.535,2.261 37.595,2.201 ; R43.1@38.704,5.666 38.704,3.239 38.894,3.048 38.894,2.639 38.414,2.159 37.637,2.159 37.595,2.201 ; R41.1@38.729,7.563 38.752,7.54 38.875,7.54 39.186,7.229 39.186,5.989 39.01,5.813 38.931,5.813 R43.1@38.755,5.637
  Top Layer w0.203: v1(7.013,51.128) 7.08,51.128 7.268,50.94 7.284,50.94 7.336,50.889 U1.5@8.09,50.889
  Top Layer w0.305: C54.2@1.583,49.565 1.68,49.467 2.62,49.467 C52.2@2.726,49.362 2.726,51.002 L7.2@2.69,51.038 ; JP1.3@2.796,11.333 3.446,11.333 5.57,13.456 5.57,15.431 ; U16.5@7.779,13.378 7.779,14.498 8.122,14.841 C399.1@8.122,16.696 ; v1(9.794,11.538) 10.019,11.538 10.393,11.912 C398.1@11.043,11.912 ; U4.5@10.941,36.543 11.283,36.543 11.376,36.451 11.376,35.722 11.93,35.169 11.93,34.44 11.683,34.194 ; C398.1@11.043,12.026 11.547,12.53 11.547,12.631 11.56,12.644 11.56,15.904 12.184,16.528 12.184,17.001 11.63,17.554 9.022,17.554 8.415,16.948 8.374,16.948 C399.1@8.122,16.696 ; v1(20.835,31.476) 20.835,32.423 19.57,33.688 12.219,33.688 11.713,34.194 11.683,34.194 ; 5.57,15.431 5.57,19.119 4.714,19.975 4.714,20.564 6.367,22.218 6.367,28.451 8.041,30.125 8.927,30.125 9.989,31.186 9.989,33.025 10.912,33.948 11.437,33.948 11.683,34.194 ; 5.57,15.431 6.886,16.747 8.076,16.747 8.122,16.7 C399.1@8.122,16.696
  Layer 3 w0.142: v1(31.02,3.346) 33.538,3.346 33.695,3.503 v1(33.767,3.503) ; 38.057,27.169 38.085,27.169 38.347,27.431 38.692,27.431 v1(38.8,27.539)
  Layer 3 w0.154: 37.586,27.262 37.631,27.262 37.742,27.151 38.039,27.151 38.057,27.169
  Layer 3 w0.217: 37.56,27.262 37.586,27.262
  Layer 3 w0.254: 35.167,25.87 36.475,27.178 36.509,27.178 36.926,27.595 37.202,27.595 37.535,27.262 37.56,27.262
  Layer 3 w0.305: v1(2.379,49.17) 2.379,49.141 1.997,48.759 1.997,48.342 1.871,48.216 1.871,46.125 3.079,44.917 4.956,44.917
  Layer 3 w0.508: 4.956,44.917 5.818,45.779 5.818,46.34 6.25,46.772 8.699,46.772 8.737,46.734 9.346,46.734 10.18,45.901 14.434,45.901 15.122,45.212 16.456,45.212 16.934,44.735 18.409,44.735 18.706,45.032 18.706,45.09 19.308,45.692 21.349,45.692 v1(22.36,46.703) ; v1(20.835,31.476) 20.511,31.152 20.511,29.582 21.241,28.852 30.348,28.852 33.607,25.593 34.89,25.593 35.167,25.87
  Layer 4 w0.305: v1(20.835,31.476) 20.835,32.548 20.533,32.85 20.533,35.07 23.014,37.552 23.014,38.267 23.041,38.294 23.041,39.244 22.808,39.478 22.808,43.203 23.433,43.828 23.433,45.49 23.463,45.52 23.463,46.321 23.081,46.703 v1(22.36,46.703)
  Bottom Layer w0.142: v1(7.497,-0.368) 7.524,-0.341 7.524,0.943 BTB_1.93@7.551,0.97 ; v1(29.483,3.055) 29.517,3.089 30.691,3.089 30.948,3.346 v1(31.02,3.346)
  Bottom Layer w0.254: BTB_1.93@7.551,0.97 BTB_1.8@7.551,4.97
  Bottom Layer w0.305: BTB_1.8@7.551,4.97 7.578,4.997 7.578,6.145 9.794,8.361 v1(9.794,11.538)
  Bottom Layer w0.508: R19.2@2.196,38.008 1.951,38.252 1.951,38.405 1.743,38.613 -0.496,38.613 -1.362,37.747 -1.362,6.033 -0.458,5.129 1.091,5.129 2.158,4.062 2.158,2.726 3.014,1.87 3.014,0.22 3.948,-0.713 7.152,-0.713 v1(7.497,-0.368) ; v1(3.007,51.452) 3.076,51.521 6.035,51.521 6.4,51.156 6.986,51.156 v1(7.013,51.128)
  other v1: 2.7,50.759 2.167,50.809 2.275,51.404
VCCA_3V3_S0: C16.2 C225.2 R135.1 U1.63 U8.AJ10 | length 132.6
  Top Layer w0.203: U1.63@10.54,52.989 10.54,53.976 10.581,54.016 10.581,54.086
  Top Layer w0.305: v1(0.681,54.255) -0.702,55.637 -0.702,59.561 1.955,62.218 1.955,63.569 3.548,65.162 5.907,65.162 7.076,66.33 27.924,66.33 28.485,66.891 32.326,66.891 32.887,66.33 40.799,66.33 41.684,67.215 R135.1@42.406,67.215 ; C16.2@8.996,56.351 8.996,56.147 10.077,55.066 10.581,54.562 10.581,54.086
  Layer 3 w0.508: v1(8.898,56.481) 8.898,54.391 10.015,53.274 10.58,53.274 10.709,53.145 16.945,53.145 17.069,53.269 25.211,53.269 27.416,51.065 27.416,46.635 28.551,45.499 31.154,45.499 33.655,45.499 v1(33.82,45.664)
  Layer 4 w0.305: 40.22,42.372 40.22,41.918 40.567,41.571 41.015,41.571 41.608,40.978 42.232,40.978 42.986,41.733 42.986,42.2 43.319,42.532 43.366,42.532 43.514,42.68 43.514,42.725 43.777,42.988 43.812,42.988 43.911,43.086 45.963,43.086 46.281,43.405 46.281,43.929 ; v1(40.366,42.547) 40.395,42.547 40.759,42.911 40.995,42.911 41.559,43.475 41.587,43.475 42.495,44.384 v1(43.523,44.384)
  Layer 4 w0.508: v1(33.82,45.664) 33.822,45.664 36.189,48.032 36.631,48.032 ; 36.631,48.029 38.747,48.029 40.713,49.995 42.346,49.995 45.475,46.866 45.475,44.735 46.281,43.929
  Bottom Layer w0.508: v1(0.681,54.255) 0.681,55.919 1.666,56.904 6.055,56.904 7.038,55.921 8.419,55.921 8.747,56.249 8.747,56.331 v1(8.898,56.481)
VCCIO_FLASH: C388.1 C389.1 C390.1 C391.1 C392.1 R103.2 R105.1 R106.1 R107.1 U11.C6 U11.M4 U11.N4 U11.P3 U11.P5 | length 29.1
  Top Layer w0.127: v1(16.569,25.953) U11.N4@16.64,25.953
  Top Layer w0.203: U11.N4@16.64,25.953 U11.P3@17.102,25.491
  Top Layer w0.305: U11.C6@11.602,26.991 11.734,27.123 12.108,27.123 v1(12.135,27.15) ; v1(15.61,25.991) U11.M4@16.102,25.991 16.531,25.991 v1(16.569,25.953) ; U11.P3@17.102,25.491 17.337,25.491 17.515,25.669 17.515,26.246 17.271,26.491 U11.P5@17.102,26.491
  Layer 4 w0.305: 15.039,27.515 15.039,27.311 15.559,26.791 15.559,26.586 15.61,26.536 v1(15.61,25.991)
  Layer 4 w0.508: v1(11.66,31.621) 11.66,28.5 12.135,28.024 ; v1(12.135,27.15) 12.135,28.024 ; v1(15.534,28.929) 15.534,28.034 15.039,27.539 15.039,27.515 13.819,28.735 12.847,28.735 12.135,28.024
  Bottom Layer w0.254: C391.1@12.135,27.108 v1(12.135,27.15)
  Bottom Layer w0.305: R105.1@10.039,24.641 9.176,25.504 9.176,27.273 9.062,27.388 9.062,29.226 11.19,31.355 11.19,31.387 11.404,31.601 11.639,31.601 v1(11.66,31.621) ; C392.1@11.351,27.684 C390.1@12.037,27.684 12.045,27.676 v1@12.045,27.241 ; R107.1@14.276,28.62 14.724,28.62 15.033,28.929 v1(15.534,28.929) 16.036,28.929 R106.1@16.646,28.319 ; v1(15.61,25.991) 16.503,25.991 16.54,25.953 v1(16.569,25.953)
VCCIO_SD_S0: C18.2 C217.2 U1.65 U8.Y7 | length 55.9
  Top Layer w0.203: 9.674,54.086 9.84,53.92 U1.65@9.84,52.989
  Top Layer w0.305: C18.2@7.476,56.448 7.683,56.241 7.683,56.093 7.832,55.944 7.968,55.944 8.707,55.205 8.707,55.053 9.674,54.086
  Layer 3 w0.254: 18.524,54.913 18.704,55.093 18.752,55.093 18.829,55.17 21.2,55.17 ; v1(45.783,39.796) 45.783,40.79 45.427,41.146 45.427,41.868 46.159,42.599 46.159,43.843
  Layer 3 w0.381: 41.381,48.06 42.849,48.06 43.388,47.521 ; 45.173,44.829 46.159,43.843
  Layer 3 w0.508: v1(13.589,55.535) 16.849,55.535 17.472,54.913 18.524,54.913 ; 21.2,55.17 26.349,55.17 29.758,51.76 29.758,48.631 30.096,48.293 30.159,48.293 30.375,48.077 41.363,48.077 41.381,48.06 ; 43.388,47.521 45.173,45.736 45.173,44.829
  Layer 4 w0.508: v1(7.476,56.481) 7.487,56.47 7.487,56.374 8.758,55.103 13.157,55.103 v1(13.589,55.535)
VDD2_DDR_S3: C22.2 C23.2 C24.2 C25.2 C192.2 C200.2 C307.2 C308.2 C309.2 C310.2 C311.2 C312.2 C313.2 C314.2 C315.2 C316.2 C317.2 C318.2 C319.2 C320.2 C321.2 C351.2 C352.2 C353.2 C354.2 C355.2 C356.2 C357.2 C358.2 C359.2 C360.2 C361.2 C362.2 C363.2 C364.2 C365.2 L3.2 R3.2 R83.1 R84.1 R93.1 R94.1 U1.30 U8.H13 U8.N8 U9.A4 U9.A9 U9.AB4 U9.AB9 U9.F5 U9.F8 U9.H1 U9.H5 U9.H8 U9.H12 U9.K1 U9.K3 U9.K10 U9.K12 U9.N1 U9.N3 U9.N10 U9.N12 U9.R1 U9.R5 U9.R8 U9.R12 U9.U5 U9.U8 U10.A4 U10.A9 U10.AB4 U10.AB9 U10.F5 U10.F8 U10.H1 U10.H5 U10.H8 U10.H12 U10.K1 U10.K3 U10.K10 U10.K12 U10.N1 U10.N3 U10.N10 U10.N12 U10.R1 U10.R5 U10.R8 U10.R12 U10.U5 U10.U8 | length 158.3
  Top Layer w0.203: U1.30@12.99,45.988 12.99,44.998 13.123,44.866
  Top Layer w0.305: v1(11.794,39.989) 11.794,39.95 11.877,39.866 C24.2@11.877,38.973 ; C23.2@12.048,40.294 12.048,40.344 12.352,40.649 L3.2@12.352,42.178 L3.2@12.398,42.178 ; v1(12.683,41.894) L3.2@12.398,42.178 ; 13.123,44.866 13.256,44.732 13.256,42.932 L3.2@12.502,42.178 ; v1(13.955,41.686) 12.995,41.686 L3.2@12.502,42.178 ; v1(53.896,52.116) 53.924,52.116 54.183,51.857 U9.A4@54.398,51.857 ; v1(54.774,46.583) 54.776,46.581 55.442,46.581 55.804,46.943 U9.H1@55.918,46.943 ; v1(55.449,16.831) 55.449,16.84 U10.AB4@55.796,17.186 ; v1(56.426,46.03) 56.432,46.024 U9.K1@56.838,46.024 ; v1(56.51,55.156) 56.98,54.686 U9.A9@57.226,54.686 ; v1(57.079,22.7) 57.082,22.697 57.082,22.336 U10.R1@57.297,22.121 ; U9.F5@57.262,50.125 57.265,50.121 57.679,50.121 v1(57.699,50.101) ; v1(57.502,47.151) 57.504,47.152 57.966,47.152 U9.K3@57.969,47.155 ; v1(57.754,23.239) 57.973,23.02 U10.N1@58.235,23.02 ; v1(58.109,13.892) 58.158,13.892 U10.AB9@58.624,14.358 ; U9.H5@58.181,49.206 58.829,49.206 v1(58.846,49.223) ; v1(58.186,42.797) 58.206,42.817 58.373,42.817 58.752,43.196 59.136,43.58 U9.R1@59.136,43.726 ; v1(58.216,44.065) U9.N1@58.216,44.645 ; U10.U5@58.66,18.919 58.66,18.661 58.916,18.405 v1(58.916,18.386) ; v1(58.897,21.918) 59.337,21.918 U10.N3@59.367,21.888 ; U9.F8@58.959,51.822 58.959,51.279 v1@59.147,51.091 ; v1(59.096,51.04) v1@59.147,51.091 ; v1(59.23,45.406) 59.25,45.426 59.25,45.678 U9.N3@59.348,45.776 ; v1(59.532,24.864) 59.614,24.782 U10.K1@59.614,24.399 ; U10.R5@59.579,19.838 59.785,19.632 v1(59.938,19.632) ; U9.H8@59.878,50.903 59.335,50.903 v1@59.147,51.091 ; U10.U8@60.357,17.221 60.405,17.27 60.948,17.27 60.963,17.285 60.98,17.285 61.212,17.517 61.212,17.845 61.2,17.858 61.2,18.065 v1(61.276,18.141) ; v1(60.395,25.753) 60.423,25.726 60.423,25.428 U10.H1@60.533,25.318 ; U10.K3@60.746,23.267 60.816,23.267 v1(60.855,23.228) ; U9.R5@61.398,45.988 61.398,46.441 v1(61.411,46.454) ; U9.K10@61.929,51.115 62.49,51.115 v1(62.504,51.128) ; U9.H12@62.141,53.165 62.626,53.165 v1(62.631,53.161) ; v1(62.257,44.669) 62.277,44.689 62.277,45.029 U9.U5@62.318,45.069 ; U10.H5@62.796,23.055 62.796,22.743 v1(62.834,22.705) ; v1(63.057,47.97) 63.085,47.942 63.085,47.696 U9.R8@63.095,47.685 ; U9.K12@63.06,52.246 63.544,52.246 v1(63.57,52.22) ; v1(63.291,50.366) 63.308,50.349 U9.N10@63.308,49.736 ; U10.N10@63.326,17.929 63.57,18.173 v1(63.57,18.184) ; v1(63.367,46.708) 63.395,46.736 63.985,46.736 U9.U8@64.015,46.766 ; U10.R12@63.539,15.878 63.539,15.699 63.752,15.486 v1(63.752,15.447) ; v1(63.714,42.136) 63.734,42.156 64.001,42.156 U9.AB4@64.05,42.205 ; U10.F5@63.715,23.974 63.715,23.565 v1(63.72,23.56) ; U9.N12@64.439,50.867 64.943,50.867 64.981,50.868 65.358,50.491 U9.R12@65.358,49.948 ; U10.N12@64.458,16.797 64.722,16.533 v1(64.739,16.533) ; U10.H8@64.493,21.358 64.986,21.358 v1(64.994,21.351) 65.021,21.379 65.074,21.379 65.412,21.717 U10.F8@65.412,22.277 ; U10.K10@64.705,19.307 64.705,18.23 v1(64.984,17.952) ; v1(65.418,27.256) 65.448,27.225 U10.A4@65.448,26.838 ; U10.K12@65.837,18.176 65.867,18.145 v1@66.302,18.145 ; U10.H12@66.756,19.095 67.199,19.095 67.202,19.092 v1(67.202,19.087) ; U9.AB9@66.878,45.034 66.878,45.444 v1(66.949,45.515) ; U10.A9@68.276,24.01 68.366,24.01 68.611,24.255 v1(68.65,24.255) ; L3.2@12.398,42.178 L3.2@12.502,42.178
  Layer 3 w0.305: v1(53.896,52.116) 53.896,52.838 55.093,54.035 55.43,54.035 ; v1(54.774,46.583) 55.873,46.583 v1(56.426,46.03) 57.324,46.03 57.502,46.208 v1(57.502,47.151) 58.31,47.151 58.625,47.465 58.625,48.974 58.846,49.195 v1(58.846,49.223) ; v1(55.449,16.831) 55.469,16.811 55.799,16.811 55.83,16.78 56.228,16.78 57.134,15.874 57.134,15.658 ; v1(56.51,55.156) 55.96,54.606 55.96,54.565 55.43,54.035 ; v1(57.079,22.7) 57.099,22.72 57.235,22.72 v1(57.754,23.239) 58.495,23.239 58.897,22.837 58.897,22.378 ; v1@57.675,50.07 58.502,49.243 58.826,49.243 v1(58.846,49.223) ; v1(57.699,50.101) 57.699,50.13 57.845,50.275 57.845,51.269 57.356,51.758 57.344,51.758 55.43,53.672 55.43,54.035 ; v1(58.109,13.892) 58.081,13.892 57.926,14.047 57.918,14.047 57.121,14.843 57.121,15.646 58.616,17.14 58.663,17.14 58.916,17.393 v1(58.916,18.386) ; v1(58.186,42.797) 58.186,43.762 58.196,43.773 58.196,44.044 v1(58.216,44.065) ; v1@58.25,44.022 59.004,44.022 59.288,44.306 59.288,44.591 59.23,44.648 v1(59.23,45.406) ; v1@58.881,18.421 59.938,19.478 v1(59.938,19.632) ; v1(58.897,21.918) 58.897,22.378 ; v1@59.288,45.327 60.284,45.327 v1(61.411,46.454) 62.248,46.454 ; v1@59.958,19.458 v1(61.276,18.141) 63.296,18.141 ; v1@59.967,19.632 60.183,19.849 60.368,19.849 60.609,20.089 60.609,20.666 58.897,22.378 ; v1(60.395,25.753) 60.395,25.741 59.532,24.877 v1(59.532,24.864) 59.532,23.937 60.221,23.248 60.835,23.248 v1(60.855,23.228) ; v1@60.98,23.239 62.3,23.239 v1(62.834,22.705) 64.071,21.468 ; v1(62.631,53.161) 62.631,52.126 ; v1(63.57,52.22) 62.725,52.22 62.631,52.126 ; v1(63.714,42.136) 63.714,43.138 62.496,44.356 62.496,44.364 62.257,44.603 62.257,46.445 62.248,46.454 ; v1(63.72,23.56) 63.732,23.56 64.071,23.22 64.071,21.468 ; v1(63.752,15.447) 63.772,15.427 64.342,15.427 64.719,15.803 64.719,16.513 v1(64.739,16.533) 64.719,16.553 64.112,16.553 63.334,17.331 63.334,18.103 63.296,18.141 ; v1(64.944,50.868) 64.924,50.888 64.362,50.888 64.233,51.016 63.167,51.016 62.897,50.747 ; v1(66.949,45.515) 66.263,45.515 65.682,46.096 65.163,46.096 64.845,46.414 63.69,46.414 63.396,46.708 v1(63.367,46.708) ; v1(67.202,19.087) 67.202,18.296 67.024,18.118 v1(66.329,18.118) 66.301,18.118 66.135,17.952 v1(64.984,17.952) ; v1(58.846,49.223) 58.846,49.251 59.096,49.501 v1(59.096,51.04) 60.743,51.04 60.987,50.795 61.533,50.795 61.845,51.108 62.483,51.108 v1(62.504,51.128) ; 62.248,46.454 63.085,46.454 63.339,46.708 v1(63.367,46.708) ; v1(62.504,51.128) 62.504,51.999 62.631,52.126 ; v1(62.504,51.128) 62.516,51.128 62.897,50.747 ; 62.897,50.747 63.278,50.366 v1(63.291,50.366) 63.291,48.232 63.057,47.998 v1(63.057,47.97) 63.077,47.95 63.077,47.727 63.367,47.437 v1(63.367,46.708) ; 63.296,18.141 63.498,18.141 63.542,18.184 v1(63.57,18.184) 64.723,18.184 64.955,17.952 v1(64.984,17.952) ; 64.071,21.468 64.188,21.351 64.886,21.351 v1(64.994,21.351) 64.994,21.339 64.623,20.969 64.623,19.66 64.984,19.299 v1(64.984,17.952)
  Layer 4 w0.254: 48.122,29.805 48.214,29.713 48.348,29.713 49.728,28.334 49.734,28.334 50.129,27.94 50.129,27.63 51.259,26.5 51.259,26.486 51.59,26.155 v1@52.102,26.155
  Layer 4 w0.305: 48.122,29.805 48.135,29.817 48.135,30.315 48.109,30.341 48.109,31.041 48.563,31.494 v1(48.563,31.523)
  Bottom Layer w0.305: C316.2@55.061,46.607 55.152,46.607 55.48,46.935 55.48,46.984 55.635,47.139 55.635,47.142 R83.1@55.603,47.174 ; R94.1@56.916,21.713 56.916,22.508 57.079,22.672 v1(57.079,22.7) ; v1@58.236,42.822 58.25,42.822 58.367,42.939 58.569,42.939 R84.1@58.601,42.907 ; v1(64.944,50.868) 64.983,50.868 65.535,50.315 C309.2@65.628,50.315
  Bottom Layer w0.381: v1(63.72,23.56) 64.579,23.56
  Bottom Layer w0.508: 64.579,23.56 67.69,26.67 67.69,27.256 ; v1(65.418,27.256) 67.69,27.256 ; v1(68.65,24.255) 68.679,24.255 69.13,24.706 69.505,24.706 69.811,25.012 69.811,26.025 68.581,27.256 67.69,27.256
  other v1: 59.291,6.891 58.059,6.912 58.689,6.902 58.729,7.476 59.324,7.486 58.071,7.521 58.711,8.05 59.293,8.047 58.081,8.065 32.781,8.928 33.357,8.941 32.25,8.964 33.339,9.449 32.811,9.472 33.339,9.957 32.808,9.983 32.812,10.571 33.339,10.579 52.14,26.185 70.164,33.866 70.766,33.856 69.534,33.876 70.205,34.44 70.799,34.45 69.547,34.486 69.557,35.029 70.187,35.014 70.769,35.012 48.503,36.168 12.327,40.014 11.768,40.573 12.302,40.599 11.946,41.919 11.946,42.427 12.708,42.427